# Altium PCB PCB_iot_2026-11-18.pcbdoc
Units mil, origin at the board's own origin, x right, y up, seen from the top; angles counter-clockwise.
Board outline 3130 x 3055 mil, 2 copper layers (Top Layer, Bottom Layer); 25 components, 15 nets, 116 pads, 4 vias.
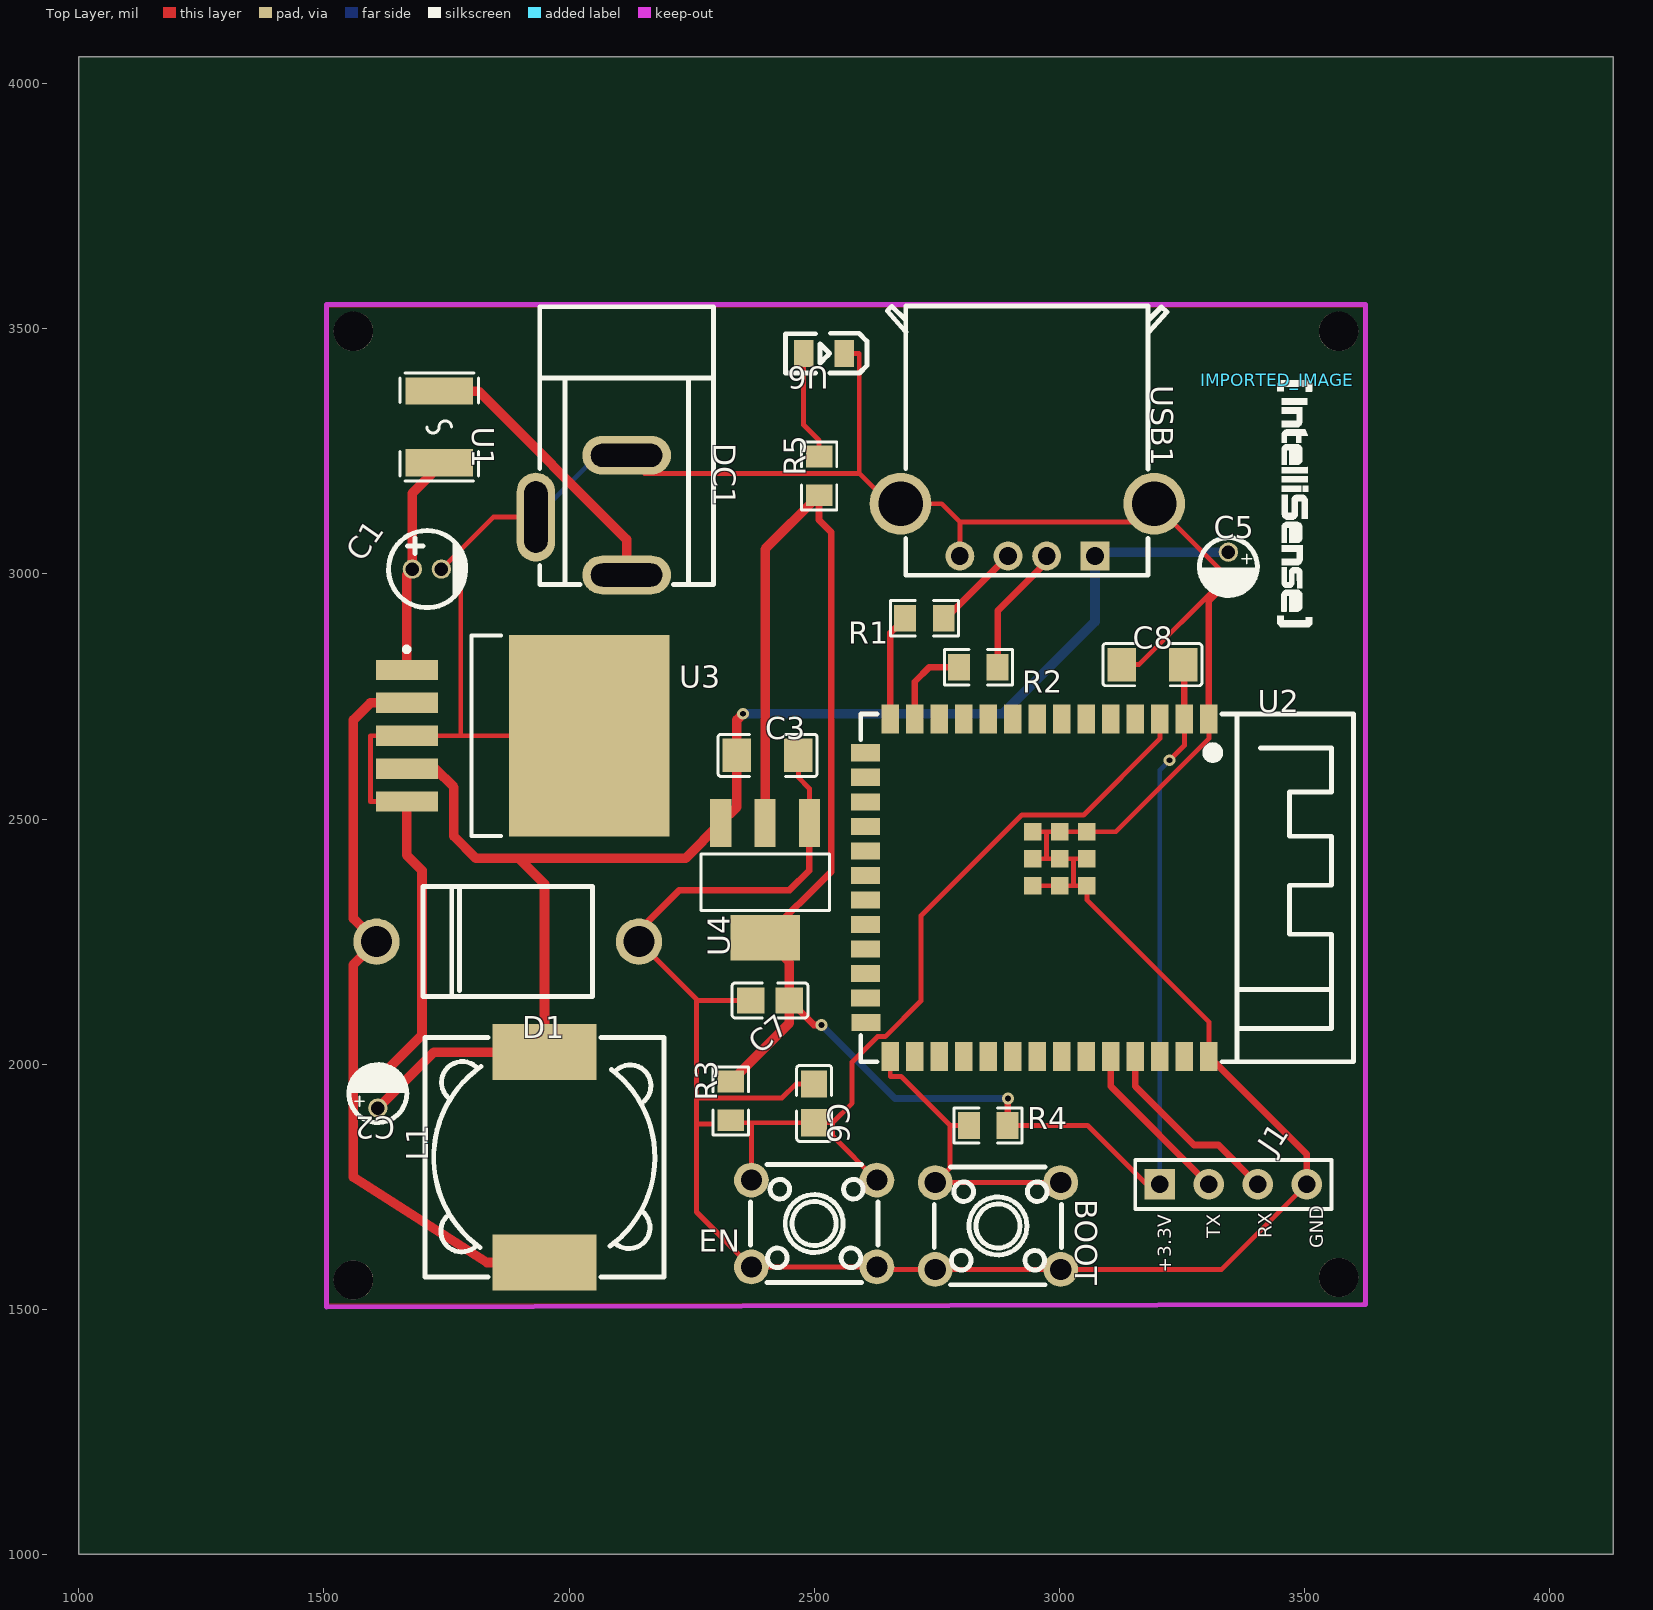
[diagram p0: Top Layer view]
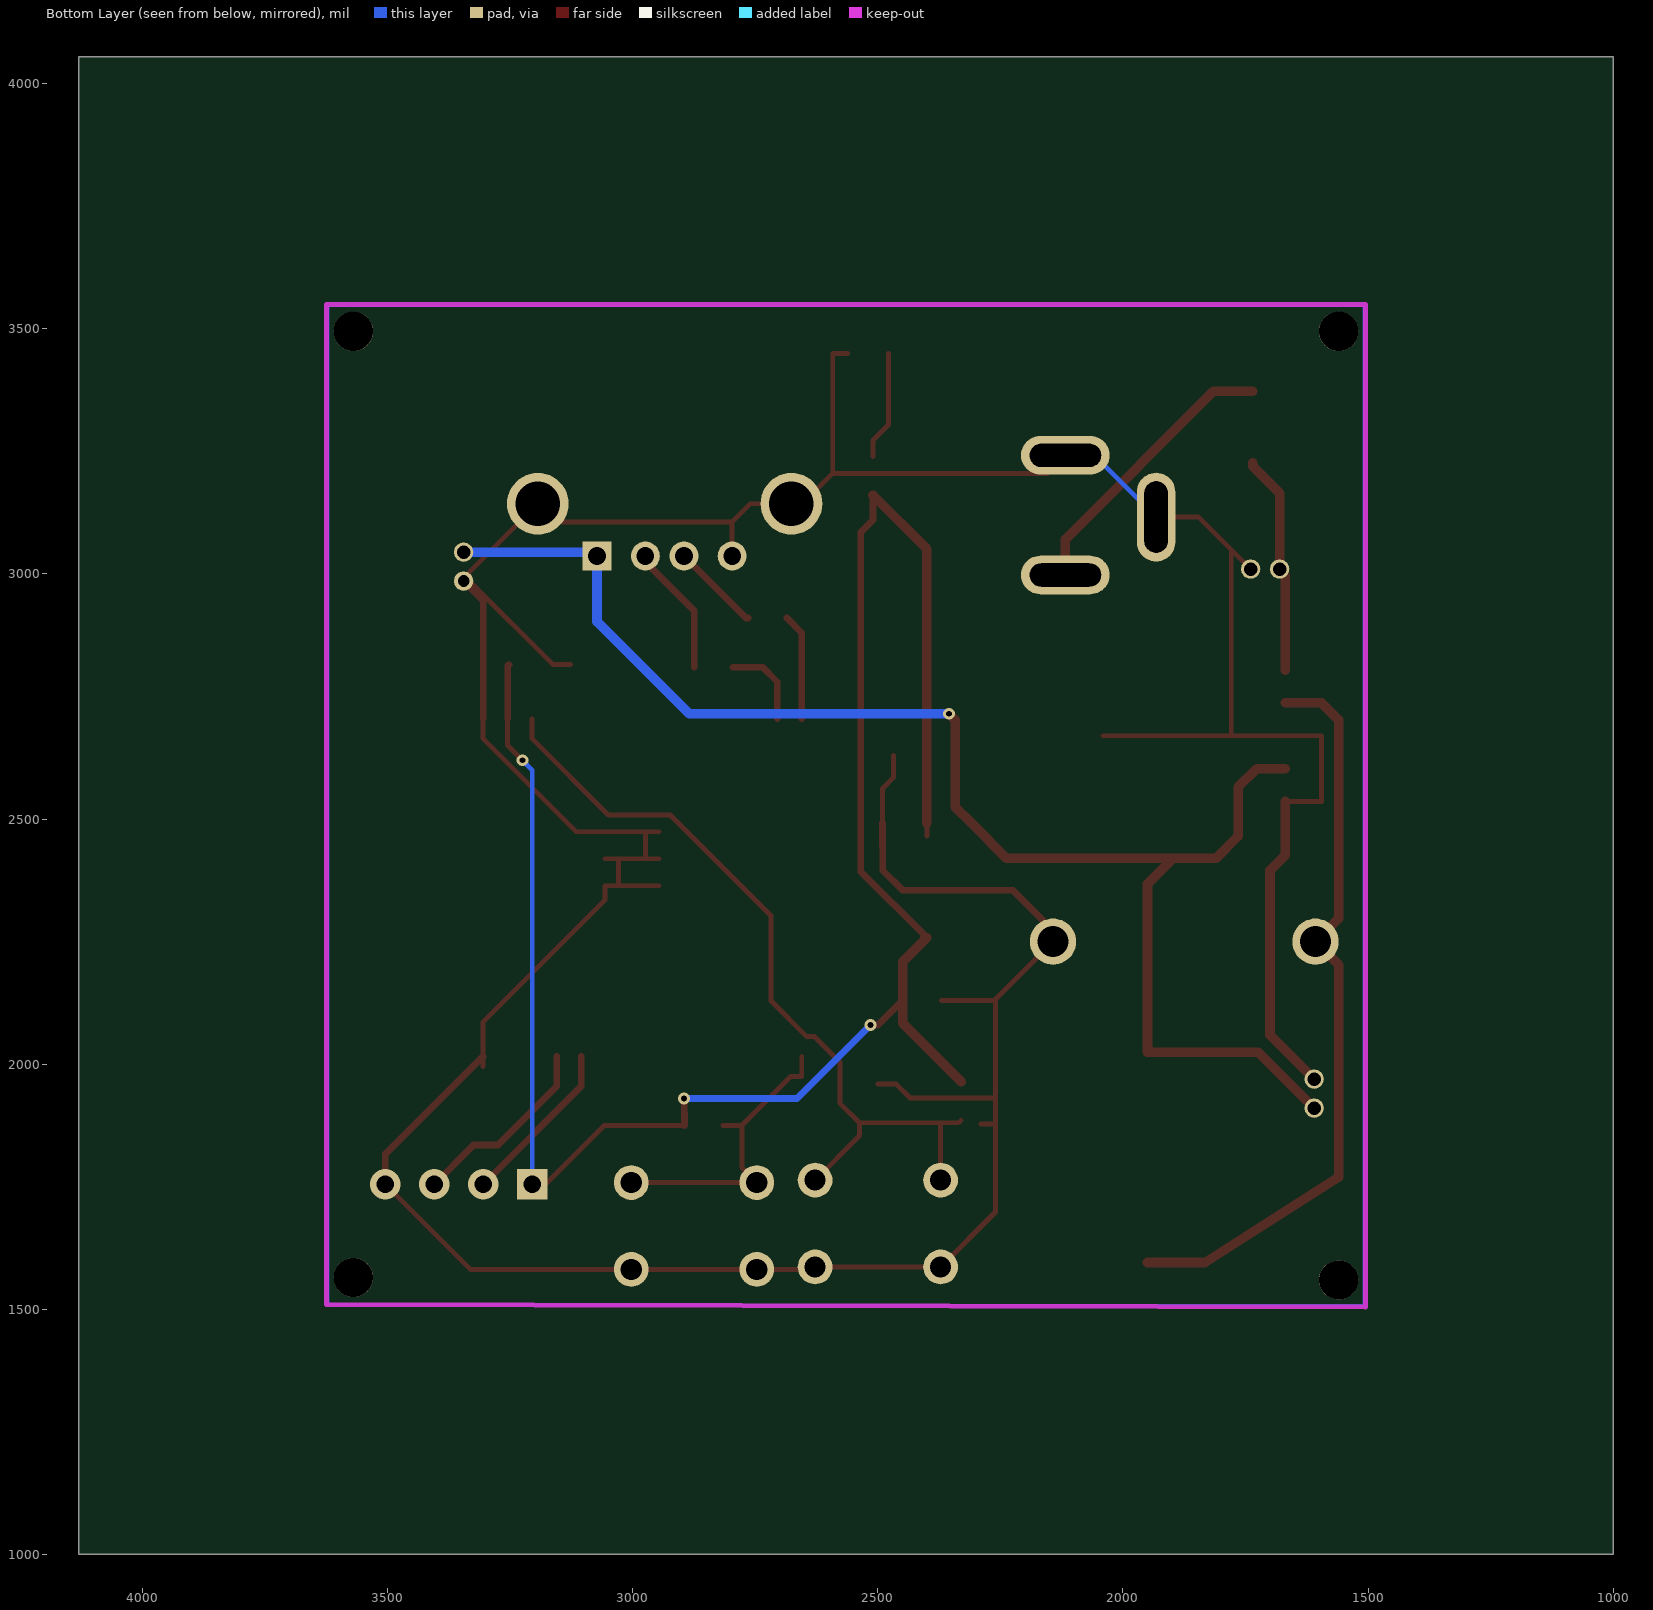
[diagram p1: Bottom Layer view, seen from below]

## Layer stack, top to bottom
Top Layer: signal copper (thickness not stored)
Dielectric: dielectric 12.6, FR-4, Dk 4.8
Bottom Layer: signal copper (thickness not stored)

## Board outline
4130,1000 1000,1000 1000,4055 4130,4055

## Components (designator, comment, footprint, x,y, rotation, side; value= is the part's Value field where it differs from the comment)
BOOT "K4-6×6_TH" KEY-TH_4P-L6.0-W6.0-P4.50-LS6.5 2875,1670 r180 top
C1 "680u" CAP-D4.0×F1.5 1710,3010 r0 top
C2 "220u" CAP-D3.0×F1.5#1 1610,1940 r90 top
C3 "10u" C1206 2405,2630 r180 top
C5 "220u" CAP-D3.0×F1.5#2 3345,3015 r270 top
C6 "1u" C0805 2500,1920 r270 top
C7 "22u" C0805 2410,2130 r0 top
C8 "10u" C1206 3190,2815 r0 top
D1 "1N5822RLG" DO-201AD_BD5.3-L8.4-P12.50-D1.4-RD 1875,2250 r0 top
DC1 "DC005-2.0MM" DC-IN-TH_DC005 2025,3120 r270 top
EN "K4-6×6_TH" KEY-TH_4P-L6.0-W6.0-P4.50-LS6.5 2500,1675 r180 top
IMPORTED_IMAGE "IMPORTED_IMAGE" IMPORTED_IMAGE 3444.81,3395.6 r0 top
J1 "HDR-M-2.54_1x4" HDR-M-2.54_1X4 3355,1755 r0 top
L1 "33uH" IND-SMD_L12.3-W12.3 1950,1810 r90 top
R1 "22" R0805 2725,2910 r180 top
R2 "22" R0805 2835,2810 r180 top
R3 "10k" R0805 2330,1925 r90 top
R4 "10k" R0805 2855,1875 r0 top
R5 "1k" R0805 2510,3200 r90 top
U1 "FUSE,12V,3A-1812" F1812 1735,3300 r270 top
U2 "ESP32-S3-WROOM-1(N16R8)" WIRELM-SMD_ESP32-S3-WROOM-1 2955,2360 r270 top
U3 "LM2596S-5.0NOPB" TS5B 1855,2670 r270 top
U4 "AMS1117-3.3" SOT-223-3_L6.5-W3.4-P2.30-LS7.0-BR 2400,2375 r90 top
U6 "YLED0805YG" LED0805-R-RD 2520,3450 r180 top
USB1 "USB-A-S-S-W-TH-R" USB-A-TH_USB-A-S-RA 2935,3090 r180 top

## Footprints (in the part's own frame and the unit in brackets; to place one, negate y for a bottom-side part, rotate by r counter-clockwise, add the part's x,y. Pads: shape width x height; smd on the part's side, far side on the other; paste and mask are expansions set on the pad)
C0805 [mm]
  rect 1.41x1.35 smd paste-100 mask+0.051: 1(-1,0) 2(1,0)
  silkscreen extent -1.96,-0.9 1.96,0.9
C1206 [mm]
  rect 1.485x1.728 smd paste-100 mask+0.051: 1(-1.593,0) 2(1.593,0)
  silkscreen extent -2.56,-1.09 2.56,1.09
CAP-D3.0×F1.5#1 [mm]
  round 1 hole 0.7 paste+0 mask+0.102: 1(-0.751,0) 2(0.751,0)
  silkscreen extent -1.5,-1.5 1.5,1.5
CAP-D3.0×F1.5#2 [mm]
  round 1 hole 0.7 paste+0 mask+0.102: 1(-0.751,0)
  round 1 hole 0.61 paste+0 mask+0.102: 2(0.75,0)
  silkscreen extent -1.5,-1.5 1.5,1.5
CAP-D4.0×F1.5 [mm]
  round 1 hole 0.7 paste+0 mask+0.102: 1(-0.751,0) 2(0.751,0)
  silkscreen extent -1.98,-2 2.02,2
DC-IN-TH_DC005 [mm]
  oval 2x4.6 hole 1.2 slot 3.7 at 90 deg paste+0 mask+0.051: 1(3.1,2.35) 2(-3.1,2.35)
  oval 4.6x2 hole 1.2 slot 3.7 at 0 deg paste+0 mask+0.051: 3(0.1,-2.35)
  silkscreen extent -10.8,-2.15 3.6,6.85
DO-201AD_BD5.3-L8.4-P12.50-D1.4-RD [mm]
  round 2.4 hole 1.6 paste+0 mask+0.051: 1(-6.8,0) 2(6.8,0)
  silkscreen extent -4.4,-2.85 4.4,2.85
F1812 [mil]
  rect 55.38x137.76 smd paste-3937.01 mask+2: 1(-72.97,0) 2(72.97,0)
  silkscreen extent -110,-80 110,80
HDR-M-2.54_1X4 [mil]
  rect 62x62 hole 35 paste+0 mask+2: 1(-150,0)
  round 62 hole 35 paste+0 mask+2: 2(-50,0) 3(50,0) 4(150,0)
  silkscreen extent -200,-50 200,50
IMPORTED_IMAGE [mil]
  silkscreen extent 0,-504 71,0
IND-SMD_L12.3-W12.3 [mm]
  rect 2.9x5.4 smd paste+0 mask+0.051: 1(-5.45,0) 2(5.45,0)
  silkscreen extent -6.2,-6.2 6.2,6.2
KEY-TH_4P-L6.0-W6.0-P4.50-LS6.5 [mm]
  round 1.8 hole 1.1 paste+0 mask+0.051: 1(-3.251,-2.25) 2(3.251,-2.25) 3(3.251,2.25) 4(-3.251,2.25)
  silkscreen extent -3.3,-3.05 3.3,3.05
LED0805-R-RD [mm]
  rect 1x1.4 smd paste+0 mask+0.051: 1(1.05,0) 2(-1.05,0)
  silkscreen extent -2.22,-1.04 1.99,1.01
R0805 [mil]
  rect 44.59x54.21 smd paste-3937.01 mask+2: 1(-39.37,0) 2(39.37,0)
  silkscreen extent -69,-36 69,36
SOT-223-3_L6.5-W3.4-P2.30-LS7.0-BR [mm]
  rect 2.5x1.1 smd paste+0 mask+0.051: 1(2.97,-2.3) 2(2.97,0) 3(2.97,2.3)
  rect 2.34x3.6 smd paste+0 mask+0.051: 4(-2.97,0)
  silkscreen extent -1.57,-3.33 1.37,3.33
TS5B [mil]
  rect 41.5x126.5 smd paste+0 mask+2: 1(-134,-186) 2(-67,-186) 3(0,-186) 4(67,-186) 5(134,-186)
  rect 411.5x327.5 smd paste+0 mask+2: 6(0,186)
  silkscreen extent -205,-191 205,7
USB-A-TH_USB-A-S-RA [mm]
  rect 1.5x1.5 hole 0.92 paste+0 mask+0.05: 1(-3.5,1.355)
  round 1.5 hole 0.92 paste+0 mask+0.05: 2(-1,1.355) 3(1,1.355) 4(3.5,1.355)
  round 3.2 hole 2.3 paste+0 mask+0.051: 5(-6.57,-1.355) 6(6.57,-1.355)
  silkscreen extent -7.23,-11.6 7.26,2.35
WIRELM-SMD_ESP32-S3-WROOM-1 [mm]
  rect 1.5x0.9 smd paste+0 mask+0.05: 1(-8.75,8.895) 2(-8.75,7.625) 3(-8.75,6.355) 4(-8.75,5.085) 5(-8.75,3.815) 6(-8.75,2.545) 7(-8.75,1.275) 8(-8.75,0.005) 9(-8.75,-1.265) 10(-8.75,-2.535) 11(-8.75,-3.805) 12(-8.75,-5.075) 13(-8.75,-6.345) 14(-8.75,-7.615) 27(8.75,-7.615) 28(8.75,-6.345) 29(8.75,-5.075) 30(8.75,-3.805) 31(8.75,-2.535) 32(8.75,-1.265) 33(8.75,0.005) 34(8.75,1.275) 35(8.75,2.545) 36(8.75,3.815) 37(8.75,5.085) 38(8.75,6.355) 39(8.75,7.625) 40(8.75,8.895)
  rect 0.9x1.5 smd paste+0 mask+0.05: 15(-6.985,-8.895) 16(-5.715,-8.895) 17(-4.445,-8.895) 18(-3.175,-8.895) 19(-1.905,-8.895) 20(-0.635,-8.895) 21(0.635,-8.895) 22(1.905,-8.895) 23(3.175,-8.895) 24(4.445,-8.895) 25(5.715,-8.895) 26(6.985,-8.865)
  rect 0.9x0.9 smd paste+0 mask+0.051: 41(-2.9,1.175) 41(-2.9,2.575) 41(-2.9,-0.225) 41(-1.501,2.575) 41(-1.501,1.175) 41(-1.501,-0.225) 41(-0.1,2.575) 41(-0.1,1.175) 41(-0.1,-0.225)
  silkscreen extent -9,-9.14 9.02,16.39

## Free pads (board coordinates)
  round 80 hole 80 unplated paste+0: ""(1560,1560) ""(1560,3495) ""(3570,1565)
  round 80.16 hole 80.16 unplated paste+0: ""(3570,3495)

## Via types
v1: diameter 24.02, hole 12.01, Top Layer to Bottom Layer, tented both sides, 2 vias
v2: diameter 24.41, hole 12.2, Top Layer to Bottom Layer, tented both sides, 2 vias

## Nets (pads, with @x,y where several pads share a name; then routed paths per layer and width w, separated by ;. In a path a pad name is that pad's centre, name@x,y a point inside that pad or via, vN(x,y) a via of type N, cw(c..) or ccw(c..) an arc to the next point about the centre after c; other vN are vias at no path point)
+3.3V: C7.2 C8.2 J1.1 R3.2 R4.2 R5.1 U2.2 U4.2 U4.4 | length 4141.2
  Top Layer w10: U4.4 U4.4@2409.45,2258.07 ; U4.2@2400,2465.8 U4.2 ; 2510,3127.34 R5.1 ; R4.2 3058.01,1875 3178.01,1755 J1.1 ; v1(3225,2620) 3255.2,2650.2 3255.2,2663.97 U2.2
  Top Layer w13.78: U4.4 2535,2393.07 2535,3085 2510,3110 R5.1 ; C7.2 2499.37,2080 v2(2515,2080) ; R4.2 v2(2895,1930) ; C8.2 3255.2,2812.5 U2.2
  Top Layer w19.68: R3.2 2449.37,2083.74 C7.2 2449.37,2208.7 U4.4 ; U4.2 2400,3050.63 R5.1
  Bottom Layer w10: J1.1 3205,2600 v1(3225,2620)
  Bottom Layer w13.78: v2(2515,2080) 2665,1930 v2(2895,1930)
+5V: C2.1 C3.2 C5.1 L1.2 U3.4 U4.3 USB1.1 | length 3055.9
  Top Layer w19.68: C2.1 1724.12,2024.57 L1.2 1950,2367.57 1897.57,2420 ; U3.4 1727,2603 1765,2565 1765,2465 1810,2420 2067.29,2420 2237.52,2420 U4.3 2342.3,2524.78 C3.2 2342.3,2702.3 v1(2355,2715)
  Bottom Layer w19.68: v1(2355,2715) 2885,2715 3072.8,2902.8 USB1.1 3080.7,3044.55 C5.1
+12V_IN: C1.1 U1.2 U3.1 | length 450.4
  Top Layer w19.68: U3.1 1669,2998.55 1680.45,3010 1680.45,3165 1735,3219.55 U1.2
BOOT: BOOT.1 BOOT.2 R4.1 U2.27 | length 627.3
  Top Layer w10: U2.27 2655.2,1974.99 2677.35,1974.99 2777.34,1875 ; R4.1 2777.34,1875 ; BOOT.1 BOOT.2 2777.34,1788.94 2777.34,1875
DC1_1: DC1.1 U1.1 | length 580.2
  Top Layer w19.68: U1.1 1814.87,3372.97 2117.52,3070.32 DC1.1
EN: C6.2 EN.1 EN.2 R3.1 U2.3 | length 1664.6
  Top Layer w10: R3.1 2335,1880.63 C6.2 2537.57,1880.63 ; EN.2 2372,1880.63 ; EN.1 2537.57,1854.03 2537.57,1880.63 ; U2.3 3205.2,2663.97 3049.66,2508.43 2923.43,2508.43 2717.97,2302.97 2717.97,2129.31 2644.88,2056.22 2629.33,2056.22 2577.5,2004.39 2577.5,1920.56 2537.57,1880.63
GND: BOOT.3 BOOT.4 C1.2 C2.2 C3.1 C5.2 C6.1 C7.1 C8.1 D1.2 DC1.2 DC1.3 EN.3 EN.4 J1.4 U2.1 U2.40 U2.41 U3.3 U3.5 U3.6 U4.1 U6.2 USB1.4 USB1.5 USB1.6 | length 9159.8
  Top Layer w10: U3.5 1594.76,2536 1594.69,2536.07 1594.69,2669.93 1594.76,2670 U3.3 1779.11,2670 ; C1.2 1779.11,3049.56 ; DC1.3 1845.61,3116.06 1779.11,3049.56 ; U3.6 1779.11,2670 ; DC1.2 2154.31,3205.26 2592.03,3205.26 ; D1.2 2262.72,2130 2289.42,2130 ; 2292.26,1931.02 2434.09,1931.02 2462.44,1959.37 2494.96,1959.37 2497.92,1959.37 C6.1 ; C7.1 2289.42,2130 ; C3.1 2467.7,2584.99 2490.55,2562.14 U4.1 ; U6.2 2592.03,3450 2592.03,3205.26 ; USB1.4@2797.2,3036.65 2797.2,3106.29 ; U2.41@2946.14,2363.94 3001.25,2363.94 3028.81,2363.94 ; U2.41@2946.13,2419.06 2973.7,2419.06 ; U2.41@2946.14,2474.18 2973.7,2474.18 ; U2.41@3056.37,2419.06 3028.81,2419.06 ; C8.1 3162.53,2815 3332.98,2985.45 3345,2985.45 3345,2992.01 USB1.5 3156.6,3106.29 2797.2,3106.29 ; U2.40@3305.2,1995.25 U2.40 3305.2,2086.4 3056.37,2335.23 3056.37,2363.94 3028.81,2363.94 ; U2.1 3305.2,2684.23 3305.2,2663.97 3115.41,2474.18 3056.37,2474.18 3001.25,2474.18 2973.7,2474.18 ; J1.4 3331.4,1581.4 BOOT.4 BOOT.3 2633,1581.4 EN.4 EN.3 2260,1698.4 2260,1877.9 ; 1779.11,2670 1779.11,3049.56 ; 2260,1877.9 2289.4,1877.9 2260,1877.9 ; 2260,1877.9 2260,1931 ; 2260,1931 2292.3,1931 2260,1931 ; 2260,1931 2260,2130 2289.4,2130 ; 2592.03,3205.26 2653.94,3143.35 USB1.6 2760.14,3143.35 2797.2,3106.29 ; 2973.7,2419.06 3001.25,2419.06 3028.81,2419.06 ; 2973.7,2419.06 2973.7,2474.18 ; 3028.81,2363.94 3028.81,2419.06
  Top Layer w13.78: D1.2 2142.7,2272.7 2225,2355 2450,2355 2490,2395 U4.1 ; U2.40 3505,1815.71 J1.4 ; U2.1 3305.2,2945.65 C5.2@3345,2985.45
  Top Layer w19.68: C2.2 1700,2059.55 1700,2395 1669,2426 U3.5
  Bottom Layer w10: DC1.3 2058.46,3242.04 DC1.2
GPIO_19: R2.2 U2.13 | length 178.5
  Top Layer w13.78: U2.13 2705.2,2780.2 2735,2810 R2.2
GPIO_20: R1.2 U2.14 | length 218.1
  Top Layer w13.78: U2.14 2655.2,2879.57 R1.2
R1_1: R1.1 USB1.3 | length 183.7
  Top Layer w13.78: R1.1 2768.98,2910 USB1.3
R2_1: R2.1 USB1.2 | length 268.1
  Top Layer w13.78: R2.1 2874.4,2924.4 2974.4,3024.4 USB1.2@2974.4,3036.7
RX: J1.3 U2.37 | length 393.3
  Top Layer w13.78: U2.37 3155.2,1954.8 3275,1835 3325,1835 J1.3
TX: J1.2 U2.36 | length 343.3
  Top Layer w13.78: U2.36 3105.2,1954.8 J1.2
U3_2: D1.1 L1.1 U3.2 | length 1536
  Top Layer w19.68: 1594.76,2737 U3.2 ; 1594.8,2737 1560,2702.2 1560,2297.3 D1.1 1559.75,2202.47 1560,1770 1832.71,1595.43 L1.1
U6_1: R5.2 U6.1 | length 223.6
  Top Layer w10: U6.1 2478.65,3304.01 2510,3272.66 R5.2
pads on no net: U2.4 U2.5 U2.6 U2.7 U2.8 U2.9 U2.10 U2.11 U2.12 U2.15 U2.16 U2.17 U2.18 U2.19 U2.20 U2.21 U2.22 U2.23 U2.24 U2.25 U2.26 U2.28 U2.29 U2.30 U2.31 U2.32 U2.33 U2.34 U2.35 U2.38 U2.39

## Polygon pours and split planes (outlines as drawn)
GND on Bottom Layer (solid): 1510,3545 3620,3545 3620,1515 3615,1510 1510,1510 1510,3545
GND on Top Layer (solid): 1510,3545 3620,3545 3620,1515 3615,1510 1510,1510 1510,3545

## Silkscreen, mask and mechanical layers (free items; w line width, h text height)
Top Overlay:
  text "TX" at 3328.78,1645 h27.56 r90
  text "RX" at 3433.78,1645 h27.56 r90
  text "GND" at 3538.78,1625 h27.56 r90
  text "+3.3V" at 3228.78,1575 h27.56 r90